# Altium PCB PCB1.PcbDoc
Units mm, origin at the board's own origin, x right, y up, seen from the top; angles counter-clockwise.
Board outline 46 x 20 mm, 2 copper layers (Top Layer, Bottom Layer), stack 1.71 mm thick; 25 components, 3 nets, 41 pads, 65 vias.
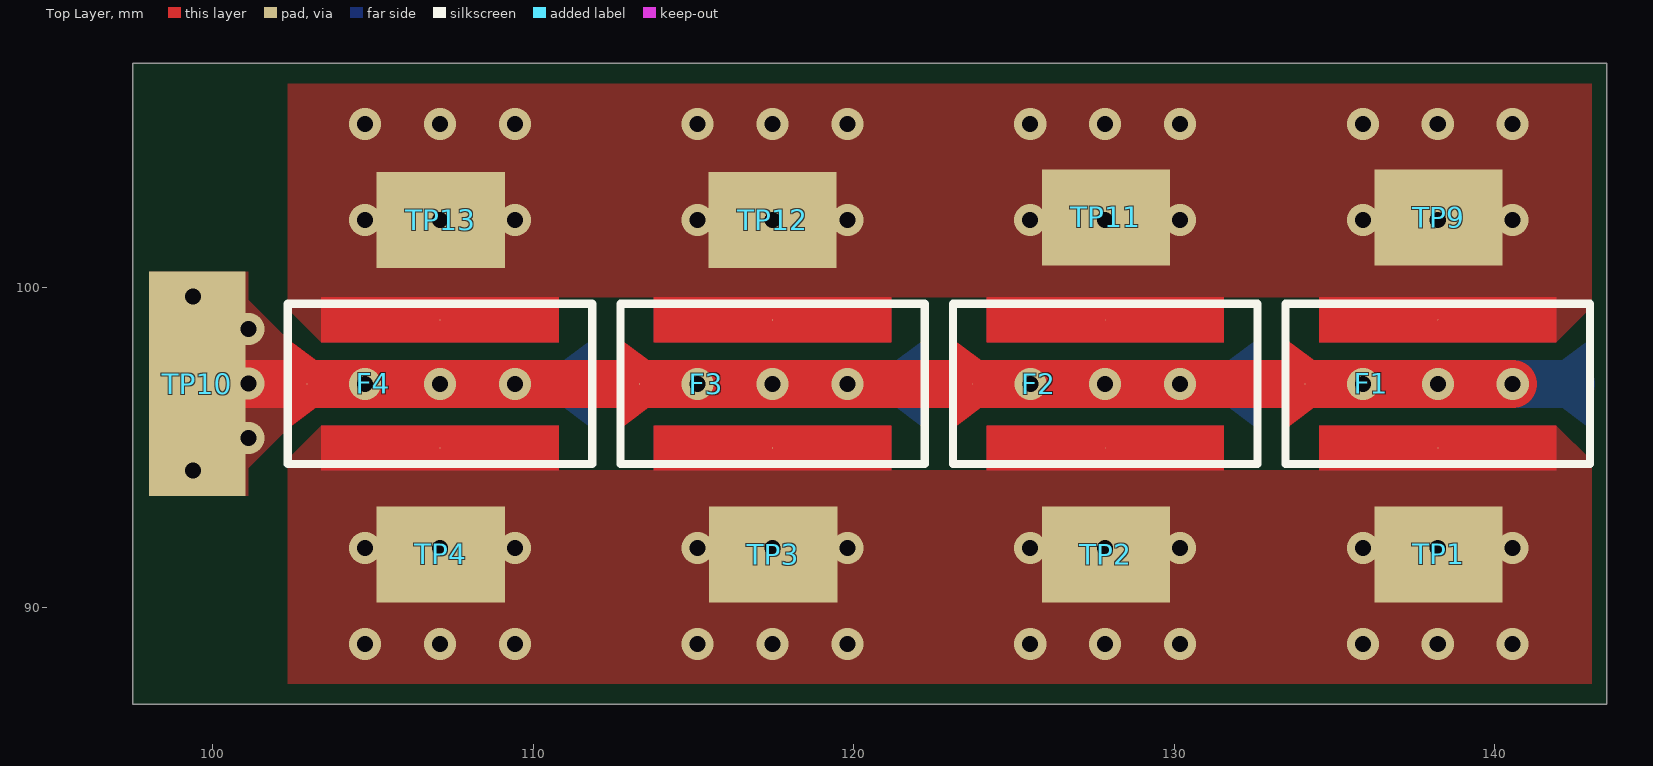
[diagram p0: Top Layer view]
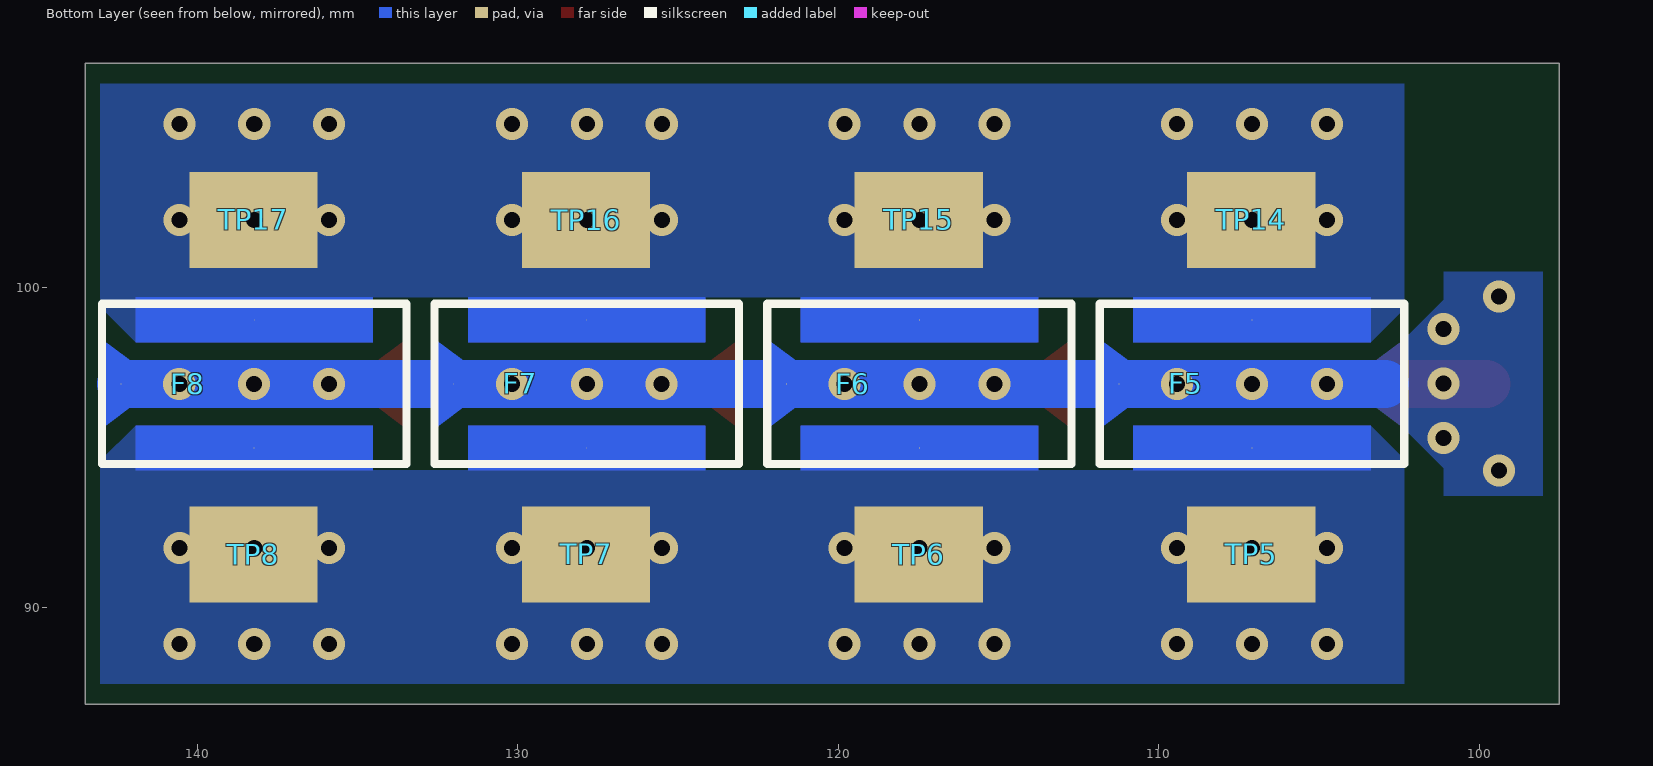
[diagram p1: Bottom Layer view, seen from below]

## Layer stack, top to bottom
Top Solder: solder mask 0.0102, Solder Resist, Dk 3.5
Top Layer: signal copper 0.105
Dielectric 1: core 1.5, FR-4, Dk 4.8
Bottom Layer: signal copper 0.105
Bottom Solder: solder mask 0.0102, Solder Resist, Dk 3.5

## Board outline
97.5,87 97.5,107 143.5,107 143.5,87

## Design rules (kind name [scope] priority, off if disabled: settings)
Clearance [All] p1: gap=0.254 ignorepadtopadclearanceinfootprint=FALSE except(0: Arc-Hole Track-Hole SMDPad-Hole THPad-Hole Via-Hole Fill-Hole Poly-Hole Region-Hole Text-Hole)
MinimumSolderMaskSliver [All] p1: minsoldermaskwidth=0
PolygonConnect [All] p1: connectstyle=Direct reliefconductorwidth=0.254 reliefentries=4 polygonreliefangle="90 Angle" airgapwidth=0.254
RoutingVias [All] p1: holewidth=0.5 width=1 viastyle="Through Hole" minholewidth=0.5 minwidth=1 maxholewidth=0.5 maxwidth=1
SilkToSilkClearance [All] p1: silktosilkclearance=0.127
SilkToSolderMaskClearance [IsPad] p1: minsilkscreentomaskgap=0 clearancetoexposedcopper=TRUE
SolderMaskExpansion [All] p1: expansion=0.102 istentingtop=FALSE
UnRoutedNet [All] p1: checkbadconnections=TRUE
Width [All] p1: maxlimit=5 minlimit=0.254 preferedwidth=0.254 minimp=50.000000 maximp=50.000000 favimp=50.000000
26 further rules are at their usual default settings.

## Components (designator, comment, footprint, x,y, rotation, side; value= is the part's Value field where it differs from the comment)
F1 "SCP60A4K" SCP60a4k 138.225,96.99 r0 top
F2 "SCP60A4K" SCP60a4k 127.846,96.99 r0 top
F3 "SCP60A4K" SCP60a4k 117.468,96.99 r0 top
F4 "SCP60A4K" SCP60a4k 107.089,96.99 r0 top
F5 "SCP60A4K" SCP60a4k 107.089,96.99 r180 bottom
F6 "SCP60A4K" SCP60a4k 117.468,96.99 r180 bottom
F7 "SCP60A4K" SCP60a4k 127.846,96.99 r180 bottom
F8 "SCP60A4K" SCP60a4k 138.225,96.99 r180 bottom
TP1 "3x4mm Test Pad SMD" "3x4mm Test Pad SMD" 138.248,91.669 r90 top
TP2 "3x4mm Test Pad SMD" "3x4mm Test Pad SMD" 127.869,91.669 r90 top
TP3 "3x4mm Test Pad SMD" "3x4mm Test Pad SMD" 117.49,91.669 r90 top
TP4 "3x4mm Test Pad SMD" "3x4mm Test Pad SMD" 107.112,91.669 r90 top
TP5 "3x4mm Test Pad SMD" "3x4mm Test Pad SMD" 107.112,91.669 r270 bottom
TP6 "3x4mm Test Pad SMD" "3x4mm Test Pad SMD" 117.49,91.669 r270 bottom
TP7 "3x4mm Test Pad SMD" "3x4mm Test Pad SMD" 127.869,91.669 r270 bottom
TP8 "3x4mm Test Pad SMD" "3x4mm Test Pad SMD" 138.248,91.669 r270 bottom
TP9 "3x4mm Test Pad SMD" "3x4mm Test Pad SMD" 138.248,102.184 r90 top
TP10 "10X10MM TEST PAD SMD" "10X10MM TEST PAD SMD" 99.517,96.997 r270 top
TP11 "3x4mm Test Pad SMD" "3x4mm Test Pad SMD" 127.869,102.184 r90 top
TP12 "3x4mm Test Pad SMD" "3x4mm Test Pad SMD" 117.468,102.108 r90 top
TP13 "3x4mm Test Pad SMD" "3x4mm Test Pad SMD" 107.112,102.108 r90 top
TP14 "3x4mm Test Pad SMD" "3x4mm Test Pad SMD" 107.112,102.108 r90 bottom
TP15 "3x4mm Test Pad SMD" "3x4mm Test Pad SMD" 117.49,102.108 r270 bottom
TP16 "3x4mm Test Pad SMD" "3x4mm Test Pad SMD" 127.869,102.108 r270 bottom
TP17 "3x4mm Test Pad SMD" "3x4mm Test Pad SMD" 138.248,102.108 r270 bottom

## Footprints (in the part's own frame and the unit in brackets; to place one, negate y for a bottom-side part, rotate by r counter-clockwise, add the part's x,y. Pads: shape width x height; smd on the part's side, far side on the other; paste and mask are expansions set on the pad)
"3x4mm Test Pad SMD" [mm]
  rect 3x4 smd: 1(0,0)
"10X10MM TEST PAD SMD" [mm]
  rect 7x3 smd: 1(0,0)
SCP60a4k [mil]
  round 1 smd: 1(0,78.71) 2(-163.39,0) 3(0,-78.71)
  Top Layer region: -145.67,51.15 -145.67,106.27 145.67,106.27 145.67,51.15
  Top Layer region: -145.67,-106.27 145.67,-106.27 145.67,-51.15 -145.67,-51.15
  Top Layer region: -187.01,-55.12 -139.76,-19.68 -139.76,19.68 -187.01,55.12
  silkscreen extent -187,-98 187,98, body extent -187,-98 187,98, height 79

## Part data
F1 F2 F3 F4 F5 F6 F7 F8: "Self Control Protector", Manufacturer Part Number=SCP60A4K

## Via types
v1: diameter 1, hole 0.5, Top Layer to Bottom Layer, 65 vias

## Nets (pads, with @x,y where several pads share a name; then routed paths per layer and width w, separated by ;. In a path a pad name is that pad's centre, name@x,y a point inside that pad or via, vN(x,y) a via of type N, cw(c..) or ccw(c..) an arc to the next point about the centre after c; other vN are vias at no path point)
NetF1_1: F1.1 F2.1 F3.1 F4.1 F5.1 F6.1 F7.1 F8.1 TP9.1 TP11.1 TP12.1 TP13.1 TP14.1 TP15.1 TP16.1 TP17.1
  other v1: 104.75,102.108 107.087,102.108 109.424,102.108 115.128,102.108 117.465,102.108 119.802,102.108 125.507,102.108 127.844,102.108 130.181,102.108 135.886,102.108 138.223,102.108 140.56,102.108 104.75,105.105 107.087,105.105 109.424,105.105 115.128,105.105 117.465,105.105 119.802,105.105 125.507,105.105 127.844,105.105 130.181,105.105 135.886,105.105 138.223,105.105 140.56,105.105
NetF1_2: F1.2 F2.2 F3.2 F4.2 F5.2 F6.2 F7.2 F8.2 TP10.1 | length 80.2
  Top Layer w1.5: TP10.1@99.771,96.99 v1(104.752,96.99) v1(115.131,96.99) v1(119.805,96.99) F2.2 v1(125.509,96.99) v1(130.183,96.99) F1.2 v1(138.225,96.99) v1(140.562,96.99)
  Bottom Layer w1.5: 102.939,96.99 v1(104.752,96.99) v1(109.426,96.99) v1(115.131,96.99) v1(119.805,96.99) v1(125.509,96.99) v1(130.183,96.99) F7.2 v1(138.225,96.99) F8.2
  other v1: 99.39,94.289 101.112,95.299 101.112,97.005 107.089,96.99 117.468,96.99 127.846,96.99 135.888,96.99 101.112,98.71 99.39,99.72
NetF1_3: F1.3 F2.3 F3.3 F4.3 F5.3 F6.3 F7.3 F8.3 TP1.1 TP2.1 TP3.1 TP4.1 TP5.1 TP6.1 TP7.1 TP8.1
  other v1: 104.75,88.875 107.087,88.875 109.424,88.875 115.128,88.875 117.465,88.875 119.802,88.875 125.507,88.875 127.844,88.875 130.181,88.875 135.886,88.875 138.223,88.875 140.56,88.875 104.75,91.872 107.087,91.872 109.424,91.872 115.128,91.872 117.465,91.872 119.802,91.872 125.507,91.872 127.844,91.872 130.181,91.872 135.886,91.872 138.223,91.872 140.56,91.872

## Polygon pours and split planes (outlines as drawn)
NetF1_1 on Top Layer "NONET_L-01_P-001" (solid, pour order 58): 103.389,98.289 102.339,99.339 102.339,106.35 143.027,106.35 143.027,99.392 141.925,98.289 134.525,98.289 134.525,99.689 131.546,99.689 131.546,98.289 124.146,98.289 124.146,99.689 121.168,99.689 121.168,98.289 113.768,98.289 113.794,98.315 113.794,99.689 110.789,99.689 110.789,98.289
NetF1_3 on Top Layer "NONET_L-01_P-001" (solid, pour order 57): 103.389,95.691 102.339,94.641 102.339,87.63 143.027,87.63 143.027,94.588 141.925,95.691 134.525,95.691 134.525,94.291 131.546,94.291 131.546,95.691 124.146,95.691 124.146,94.291 121.168,94.291 121.168,95.691 113.768,95.691 113.794,95.665 113.794,94.291 110.789,94.291 110.789,95.691
NetF1_2 on Top Layer "NONET_L-01_P-001" (solid, pour order 23): 103.214,97.734 102.339,98.39 101.112,99.617 101.112,100.497 98.017,100.497 98.017,93.497 101.112,93.497 101.112,94.366 102.337,95.59 103.208,96.242 103.208,97.73 103.219,97.73
NetF1_3 on Bottom Layer "NONET_L-01_P-001" (solid, pour order 59): 103.389,95.691 102.339,94.641 102.339,87.63 143.027,87.63 143.027,94.588 141.925,95.691 134.525,95.691 134.525,94.291 131.546,94.291 131.546,95.691 124.146,95.691 124.146,94.291 121.168,94.291 121.168,95.691 113.768,95.691 113.794,95.665 113.794,94.291 110.789,94.291 110.789,95.691
NetF1_1 on Bottom Layer "NONET_L-01_P-001" (solid, pour order 56): 103.389,98.289 102.339,99.339 102.339,106.35 143.027,106.35 143.027,99.392 141.925,98.289 134.525,98.289 134.525,99.689 131.546,99.689 131.546,98.289 124.146,98.289 124.146,99.689 121.168,99.689 121.168,98.289 113.768,98.289 113.794,98.315 113.794,99.689 110.789,99.689 110.789,98.289
NetF1_2 on Bottom Layer "NONET_L-01_P-001" (solid, pour order 22): 103.214,97.734 102.339,98.39 101.112,99.617 101.112,100.497 98.019,100.497 98.019,93.497 101.112,93.497 101.112,94.366 102.337,95.59 103.208,96.242 103.208,97.73 103.219,97.73
no net on Bottom Solder "NONET_L-01_P-001" (solid): 142.063,95.707 142.063,94.361 143.028,93.396 143.028,87.605 133.478,87.605 133.478,93.371 134.468,94.361 134.468,95.707
no net on Bottom Solder "NONET_L-01_P-001" (solid): 134.438,98.273 134.438,99.619 133.473,100.584 133.473,106.375 143.023,106.375 143.023,100.609 142.032,99.619 142.032,98.273
no net on Bottom Solder "NONET_L-01_P-001" (solid): 124.059,98.273 124.059,99.619 123.094,100.584 123.094,106.375 132.644,106.375 132.644,100.609 131.654,99.619 131.654,98.273
no net on Bottom Solder "NONET_L-01_P-001" (solid): 113.68,98.273 113.68,99.619 112.715,100.584 112.715,106.375 122.266,106.375 122.266,100.609 121.275,99.619 121.275,98.273
no net on Bottom Solder "NONET_L-01_P-001" (solid): 103.302,98.273 103.302,99.619 102.337,100.584 102.337,106.375 111.887,106.375 111.887,100.609 110.896,99.619 110.896,98.273
no net on Bottom Solder "NONET_L-01_P-001" (solid): 110.927,95.707 110.927,94.361 111.892,93.396 111.892,87.605 102.342,87.605 102.342,93.371 103.332,94.361 103.332,95.707
no net on Bottom Solder "NONET_L-01_P-001" (solid): 121.306,95.707 121.306,94.361 122.271,93.396 122.271,87.605 112.72,87.605 112.72,93.371 113.711,94.361 113.711,95.707
no net on Bottom Solder "NONET_L-01_P-001" (solid): 131.684,95.707 131.684,94.361 132.65,93.396 132.65,87.605 123.099,87.605 123.099,93.371 124.09,94.361 124.09,95.707
no net on Bottom Solder "NONET_L-01_P-001" (solid): 101.112,100.497 101.112,99.599 102.337,98.374 102.337,95.606 101.112,94.381 101.112,93.497 98.019,93.497 98.019,100.497
no net on Top Solder "NONET_L-01_P-001" (solid): 103.302,98.273 103.302,99.619 102.337,100.584 102.337,106.375 111.887,106.375 111.887,100.609 110.896,99.619 110.896,98.273
no net on Top Solder "NONET_L-01_P-001" (solid): 113.68,98.273 113.68,99.619 112.715,100.584 112.715,106.375 122.266,106.375 122.266,100.609 121.275,99.619 121.275,98.273
no net on Top Solder "NONET_L-01_P-001" (solid): 124.059,98.273 124.059,99.619 123.094,100.584 123.094,106.375 132.644,106.375 132.644,100.609 131.654,99.619 131.654,98.273
no net on Top Solder "NONET_L-01_P-001" (solid): 134.438,98.273 134.438,99.619 133.473,100.584 133.473,106.375 143.023,106.375 143.023,100.609 142.032,99.619 142.032,98.273
no net on Top Solder "NONET_L-01_P-001" (solid): 142.063,95.707 142.063,94.361 143.028,93.396 143.028,87.605 133.478,87.605 133.478,93.371 134.468,94.361 134.468,95.707
no net on Top Solder "NONET_L-01_P-001" (solid): 131.684,95.707 131.684,94.361 132.65,93.396 132.65,87.605 123.099,87.605 123.099,93.371 124.09,94.361 124.09,95.707
no net on Top Solder "NONET_L-01_P-001" (solid): 121.306,95.707 121.306,94.361 122.271,93.396 122.271,87.605 112.72,87.605 112.72,93.371 113.711,94.361 113.711,95.707
no net on Top Solder "NONET_L-01_P-001" (solid): 110.927,95.707 110.927,94.361 111.892,93.396 111.892,87.605 102.342,87.605 102.342,93.371 103.332,94.361 103.332,95.707
NetF1_2 on Top Solder "NONET_L-01_P-001" (solid, pour order 40): 101.112,100.497 101.112,99.599 102.337,98.374 102.337,95.606 101.112,94.381 101.112,93.497 98.044,93.497 98.044,100.497

## Silkscreen, mask and mechanical layers (free items; w line width, h text height)
Top Solder:
  rectangle: 103.302,99.517 142.011,106.375
  rectangle: 103.302,87.608 142.011,94.466
Bottom Solder:
  rectangle: 103.302,87.599 142.011,94.457
  rectangle: 103.302,99.517 142.011,106.375
Board Outline:
  the board outline again, w0.178
Fab:
  drawing of 191 lines, arcs and shapes, not listed
  text "Layer" at 155.385,105.512 h1.52
  text "Name" at 165.796,105.512 h1.52
  text "Material" at 189.412,105.512 h1.52
  text "Thickness" at 211.25,105.512 h1.52
  text "Constant" at 227.756,105.512 h1.52
  text "Board Layer Stack" at 242.23,105.512 h1.52
  text "Top Overlay" at 165.796,102.464 h1.52
  text "Top Solder" at 165.796,99.416 h1.52
  text "Solder Resist" at 189.412,99.416 h1.52
  text "0.010mm" at 211.25,99.416 h1.52
  text "3.5" at 227.756,99.416 h1.52
  text "1" at 155.385,96.368 h1.52
  text "Top Layer" at 165.796,96.368 h1.52
  text "0.105mm" at 211.25,96.368 h1.52
  text "Dielectric 1" at 165.796,93.32 h1.52
  text "FR-4" at 189.412,93.32 h1.52
  text "1.500mm" at 211.25,93.32 h1.52
  text "4.8" at 227.756,93.32 h1.52
  text "2" at 155.385,90.272 h1.52
  text "Bottom Layer" at 165.796,90.272 h1.52
  text "0.105mm" at 211.25,90.272 h1.52
  text "Bottom Solder" at 165.796,87.224 h1.52
  text "Solder Resist" at 189.412,87.224 h1.52
  text "0.010mm" at 211.25,87.224 h1.52
  text "3.5" at 227.756,87.224 h1.52
  text "Bottom Overlay" at 165.796,84.176 h1.52
  text "Total board thickness:" at 155.385,81.128 h1.52
  text "1.730mm" at 211.25,81.128 h1.52
Drill Drawing:
  lines w0.254: 96.242,117.653 97.935,117.653 97.935,119.346 96.242,119.346 96.242,117.653
  lines w0.381: 94.723,116.51 271.256,116.51 ; 94.723,120.32 271.256,120.32 ; 108.716,112.7 108.716,124.13 ; 122.428,112.7 122.428,124.13 ; 150.106,112.7 150.106,124.13 ; 162.955,112.7 162.955,124.13 ; 181.594,112.7 181.594,124.13 ; 219.682,112.7 219.682,124.13 ; 234.664,112.7 234.664,124.13 ; 253.608,112.7 253.608,124.13 ; 94.723,112.7 271.256,112.7 271.256,124.13 94.723,124.13 94.723,112.7
  text "Symbol" at 97.009,121.463 h1.83
  text "Count" at 109.859,121.463 h1.83
  text "Hole Size" at 123.571,121.463 h1.83
  text "Plated" at 151.249,121.463 h1.83
  text "Hole Type" at 164.098,121.463 h1.83
  text "Drill Layer Pair" at 182.737,121.463 h1.83
  text "Via/Pad" at 220.825,121.463 h1.83
  text "Pad Shape" at 235.807,121.463 h1.83
  text "Template" at 254.751,121.463 h1.83
  text "65" at 109.859,117.653 h1.52
  text "0.500mm (19.69mil)" at 123.571,117.653 h1.52
  text "PTH" at 151.249,117.653 h1.52
  text "Round" at 164.098,117.653 h1.52
  text "Top Layer - Bottom Layer" at 182.737,117.653 h1.52
  text "Via" at 220.825,117.653 h1.52
  text "Rounded" at 235.807,117.653 h1.52
  text "v100h50" at 254.751,117.653 h1.52
  text "65 Total" at 109.859,113.843 h1.52

## Dimensions
143.5,107 to 143.5,87 on Mechanical 1
97.5,107 to 143.5,107 on Mechanical 1